# Altium PCB PCB3+.PcbDoc
Units mm, origin at the board's own origin, x right, y up, seen from the top; angles counter-clockwise.
Board outline 63.37 x 32.64 mm, 2 copper layers (Top Layer, Bottom Layer); 56 components, 26 nets, 163 pads, 8 vias.
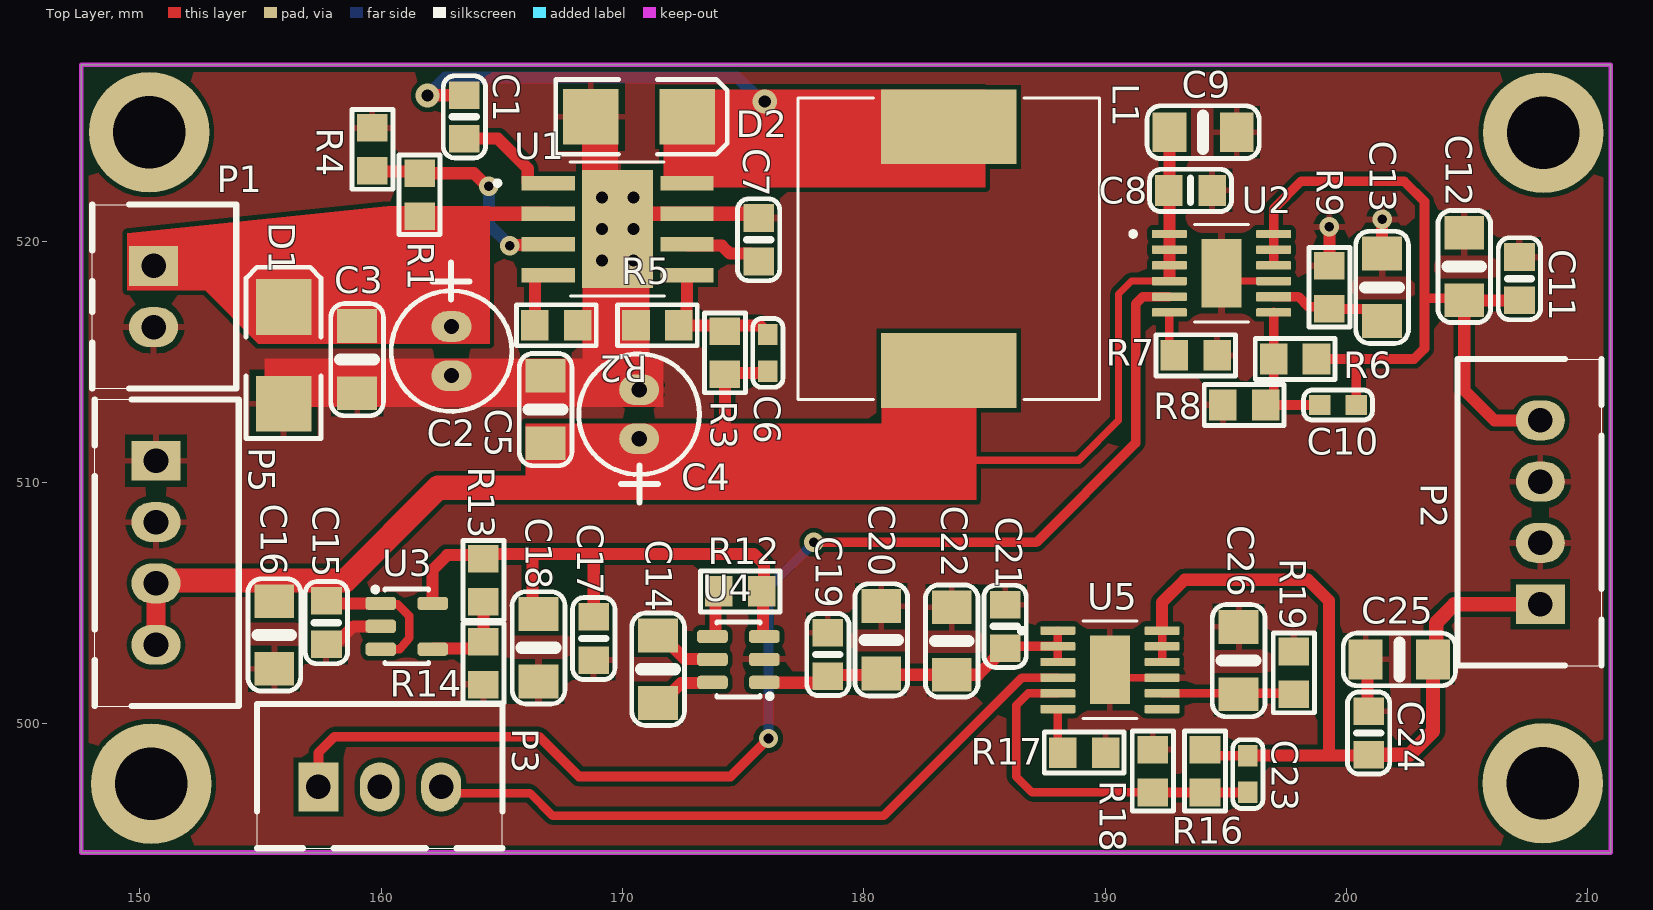
[diagram p0: Top Layer view]
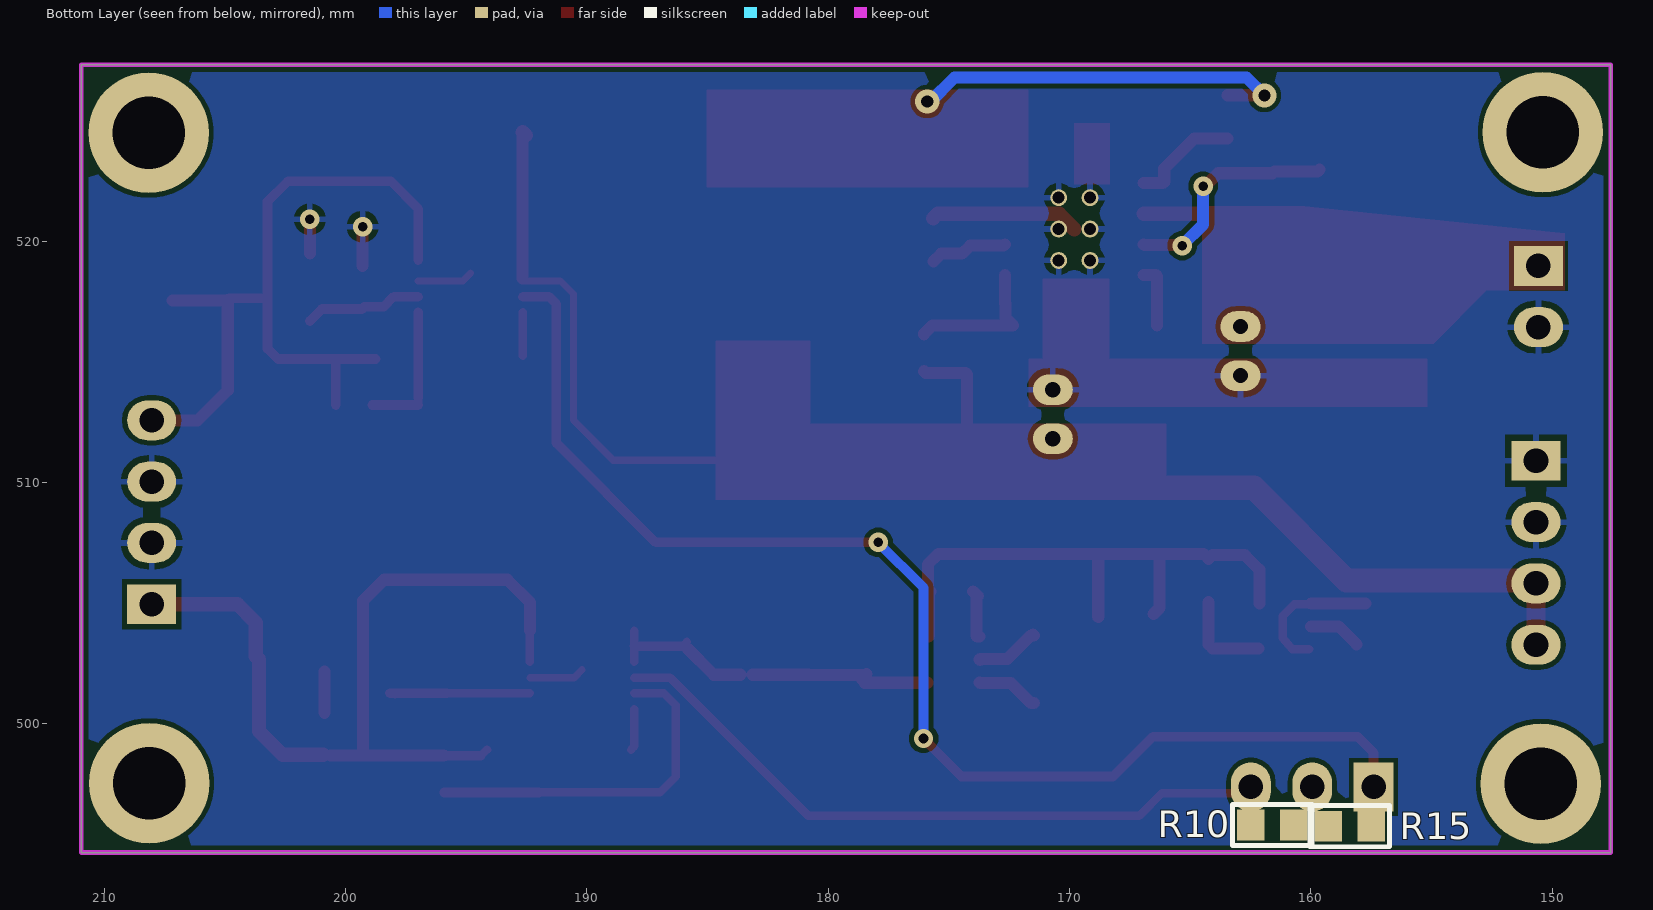
[diagram p1: Bottom Layer view, seen from below]
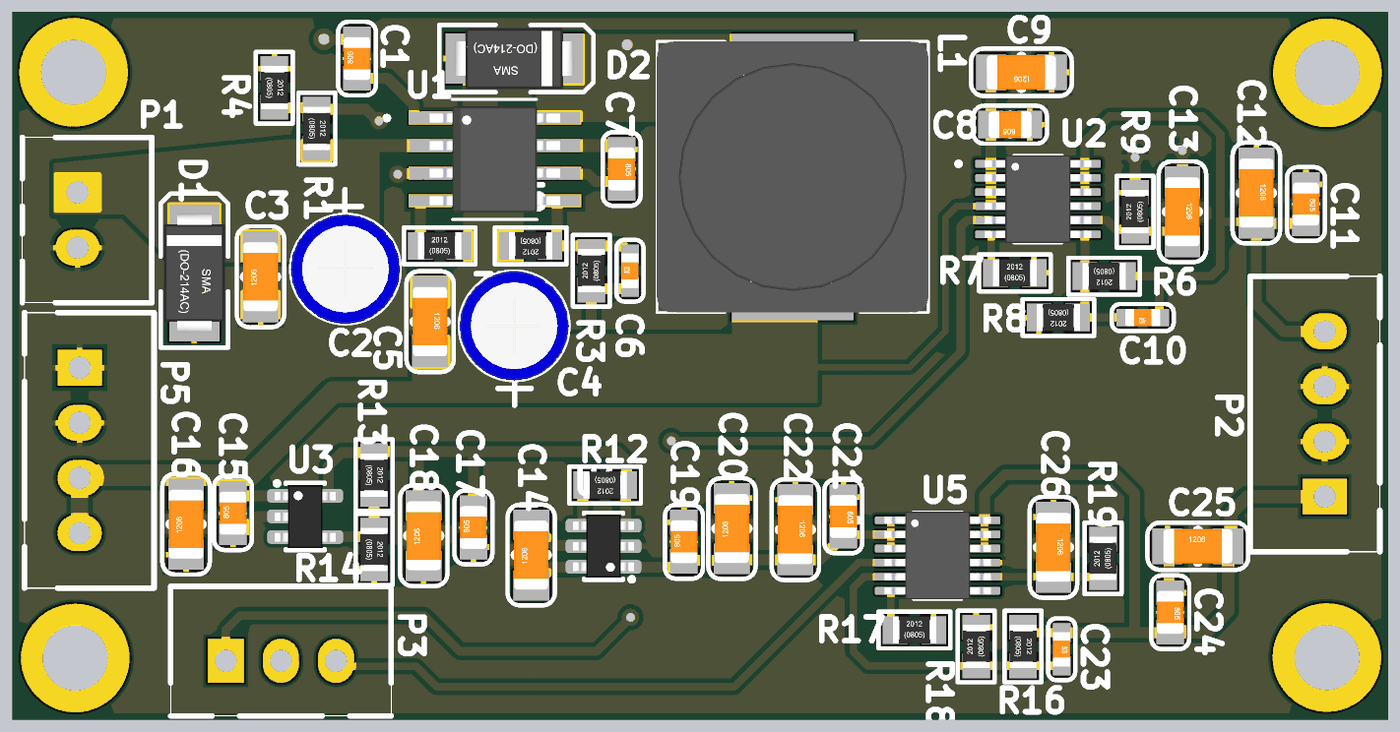
[diagram p2: 3D render of the assembled board from above, using the file's embedded part models]

## Layer stack, top to bottom
Top Solder: solder mask 0.0102, Solder Resist, Dk 3.5
Top Layer: signal copper 0.0356
Dielectric 1: dielectric 0.32, FR-4, Dk 4.8
Bottom Layer: signal copper 0.0356
Bottom Solder: solder mask 0.0102, Solder Resist, Dk 3.5

## Board outline
147.574,494.665 147.574,527.304 210.947,527.304 210.947,494.665

## Design rules (kind name [scope] priority, off if disabled: settings)
Clearance [All] p1: gap=0.2 ignorepadtopadclearanceinfootprint=FALSE except(0: Arc-Hole Track-Hole SMDPad-Hole THPad-Hole Via-Hole Fill-Hole Poly-Hole Region-Hole Text-Hole)
HoleSize [All] p1: absolutevalues=TRUE maxlimit=3 minlimit=0.025 maxpercent=80.000 minpercent=20.000
PolygonConnect [All] p1: connectstyle=Relief reliefconductorwidth=0.254 reliefentries=4 polygonreliefangle="90 Angle" airgapwidth=0.254
RoomDefinition Power2-5V [InComponentClass('Power2-5V')] p1: confinementstyle=ConfineIn formatcopy=TRUE lockcomponents=FALSE outline 0,0 50.8,0 50.8,25.4 0,25.4
RoutingVias [All] p1: holewidth=0.5 width=1 viastyle="Through Hole" minholewidth=0.4 minwidth=0.8 maxholewidth=1 maxwidth=2
SilkToSilkClearance [All] p1: silktosilkclearance=0
SilkToSolderMaskClearance [IsPad] p1: minsilkscreentomaskgap=0 clearancetoexposedcopper=TRUE
SolderMaskExpansion [All] p1: expansion=0.102 istentingtop=FALSE
SupplyNets "Schematic Supply Nets_7" [InNet('12V')] p1: voltage=0.000
SupplyNets "Schematic Supply Nets_6" [InNet('-5V')] p2: voltage=0.000
SupplyNets "Schematic Supply Nets_5" [InNet('-5.4V')] p3: voltage=0.000
SupplyNets "Schematic Supply Nets_4" [InNet('3V3')] p4: voltage=0.000
SupplyNets "Schematic Supply Nets_3" [InNet('+5.4V')] p5: voltage=0.000
SupplyNets "Schematic Supply Nets_2" [InNet('VBAT')] p6: voltage=0.000
SupplyNets "Schematic Supply Nets_1" [InNet('+5V')] p7: voltage=0.000
SupplyNets "Schematic Supply Nets" [InNet('GND')] p8: voltage=0.000
Width [All] p1: maxlimit=2 minlimit=0.254 preferedwidth=0.5 minimp=50.000000 maximp=50.000000 favimp=50.000000
27 further rules are at their usual default settings.

## Components (designator, comment, footprint, x,y, rotation, side; value= is the part's Value field where it differs from the comment)
C1 "100nF" "0805 Capacitor" 163.449,525.145 r90 top
C2 "47uf/50v/Low ESR" $CAP-RB-80MIL-D5MM 162.916,515.442 r270 top
C3 "10uF" "1206 Capacitor" 159.004,515.087 r90 top
C4 "47uf/25v/Low ESR" $CAP-RB-80MIL-D5MM 170.688,512.826 r90 top
C5 "22uF" "1206 Capacitor" 166.814,513.016 r270 top
C6 "22pF" "0603 Capacitor" 176.022,515.366 r90 top
C7 "100nF" "0805 Capacitor" 175.641,520.054 r270 top
C8 "100nF" "0805 Capacitor" 193.537,522.097 r180 top
C9 "10uF" "1206 Capacitor" 194.056,524.51 r180 top
C10 "10pF" "0603 Capacitor" 199.644,513.207 r180 top
C11 "100nF" "0805 Capacitor" 207.162,518.439 r270 top
C12 "22uF" "1206 Capacitor" 204.876,518.947 r270 top
C13 "10uF" "1206 Capacitor" 201.473,518.084 r270 top
C14 "1uF" "1206 Capacitor" 171.475,502.26 r90 top
C15 "100nF" "0805 Capacitor" 157.734,504.19 r90 top
C16 "1uF" "1206 Capacitor" 155.575,503.682 r90 top
C17 "100nF" "0805 Capacitor" 168.808,503.53 r90 top
C18 "2.2uF" "1206 Capacitor" 166.522,503.149 r90 top
C19 "100nF" "0805 Capacitor" 178.511,502.869 r90 top
C20 "2.2uF" "1206 Capacitor" 180.721,503.479 r90 top
C21 "100nF" "0805 Capacitor" 185.852,504.038 r270 top
C22 "10uF" "1206 Capacitor" 183.642,503.428 r270 top
C23 "10pF" "0603 Capacitor" 195.91,497.916 r270 top
C24 "100nF" "0805 Capacitor" 200.914,499.618 r270 top
C25 "22uF" "1206 Capacitor" 202.184,502.666 r0 top
C26 "10uF" "1206 Capacitor" 195.529,502.615 r270 top
D1 "SMBJ30CA" DO-214AC(SMA) 155.956,515.264 r0 top
D2 "SK54" DO-214AC(SMA) 170.688,525.145 r270 top
L1 "15uH/4A" IND_B82477R4103M100 183.515,519.684 r270 top
P1 "J2" "$xh-2pin male-L" 150.571,518.973 r270 top
P2 "J4" "$xh-4pin male-L" 208.026,504.952 r90 top
P3 "J3" "$xh-3pin male-L" 157.404,497.383 r0 top
P5 "J4" "$xh-4pin male-L" 150.673,510.896 r270 top
R1 "30.1K" "0805 Resistor" 161.595,521.919 r270 top
R2 "49.9K" "0805 Resistor" 167.259,516.509 r0 top
R3 "180K" "0805 Resistor" 174.244,515.366 r90 top
R4 "100K" "0805 Resistor" 159.639,523.799 r270 top
R5 "12.1K" "0805 Resistor" 171.45,516.509 r180 top
R6 "453K" "0805 Resistor" 197.866,515.112 r180 top
R7 "249K" "0805 Resistor" 193.751,515.264 r0 top
R8 "49.9K" "0805 Resistor" 195.758,513.207 r180 top
R9 "49.9K or 30.1K" "0805 Resistor" 199.288,518.084 r90 top
R10 "200K" "0805 Resistor" 161.595,495.808 r180 bottom
R12 "4.7K" "0805 Resistor" 174.879,505.485 r180 top
R13 "3K" "0805 Resistor" 164.236,505.943 r270 top
R14 "10K" "0805 Resistor" 164.236,502.514 r270 top
R15 "200K" "0805 Resistor" 158.394,495.757 r180 bottom
R16 "453K" "0805 Resistor" 194.132,498.043 r270 top
R17 "7.5K" "0805 Resistor" 189.128,498.805 r0 top
R18 "49.9K" "0805 Resistor" 191.973,498.043 r90 top
R19 "49.9K or 33.2K" "0805 Resistor" 197.815,502.107 r90 top
U1 "LMR16030PDDA" VREG_LMR16030PDDA 169.799,520.497 r0 top
U2 "LT3045EMSE#PBF" SOP65P490X110-13N#1 194.818,518.668 r0 top
U3 "AP2204" SOT23-5 161.061,504.038 r270 top
U4 "LM2776" SOT23-6 174.803,502.666 r180 top
U5 "LT3094EMSE#PBF" SOP65P490X110-13N#2 190.195,502.234 r0 top

## Footprints (in the part's own frame and the unit in brackets; to place one, negate y for a bottom-side part, rotate by r counter-clockwise, add the part's x,y. Pads: shape width x height; smd on the part's side, far side on the other; paste and mask are expansions set on the pad)
"0603 Capacitor" [mil]
  rect 35x32 smd: 1(-29.99,0.01) 2(30.01,0.01)
  silkscreen extent -56,-25 56,25, body extent -31,-16 32,16, height 12
"0805 Capacitor" [mm]
  rect 1.143x1.27 smd: 1(-0.9,0) 2(0.9,0)
  silkscreen extent -1.7,-0.87 1.7,0.87, body extent -1,-0.62 1,0.63, height 0.78
"0805 Resistor" [mil]
  rect 45x50 smd: 1(-35,0) 2(35,0)
  silkscreen extent -65,-33 65,33, body extent -39,-25 39,25, height 18
"1206 Capacitor" [mil]
  rect 55x65 smd: 1(-55,0) 2(55,0)
  silkscreen extent -92,-43 92,43, body extent -63,-31 63,31, height 39
$CAP-RB-80MIL-D5MM [mil]
  oval 50x65 hole 25: 1(-40,0) 2(40,0)
  silkscreen extent -144,-98 98,98, body extent -99,-99 99,99, height 446
"$xh-2pin male-L" [mil]
  rect 65x80 hole 40: 1(0,0)
  oval 65x80 hole 40: 2(100,0)
  silkscreen extent -100,-100 200,135, body extent -100,-100 200,135, height 295
"$xh-3pin male-L" [mil]
  rect 65x80 hole 40: 1(0,0)
  oval 65x80 hole 40: 2(100,0) 3(200,0)
  silkscreen extent -100,-100 300,135, body extent -100,-100 300,135, height 295
"$xh-4pin male-L" [mil]
  rect 65x80 hole 40: 1(0,0)
  oval 65x80 hole 40: 2(100,0) 3(200,0) 4(300,0)
  silkscreen extent -100,-100 400,135, body extent -100,-100 400,135, height 295
DO-214AC(SMA) [mm]
  rect 2.3x2.3 smd: 1(0,-2.003) 2(0,2.003)
  silkscreen extent -1.55,-3.45 1.55,3.65, body extent -1.4,-2.75 1.4,2.75, height 2.6
IND_B82477R4103M100 [mm]
  rect 3.1x5.6 smd: 1(-5.05,0) 2(5.05,0)
  silkscreen extent -6.25,-6.25 6.25,6.25, body extent -6.25,-6.25 6.25,6.25, height 8.5
SOP65P490X110-13N#1 [mm]
  rrect25% 1.45x0.35 smd paste+0 mask+0.102: 1(-2.16,1.625) 2(-2.16,0.975) 3(-2.16,0.325) 4(-2.16,-0.325) 5(-2.16,-0.975) 6(-2.16,-1.625) 7(2.16,-1.625) 9(2.16,-0.325) 10(2.16,0.325) 11(2.16,0.975) 12(2.16,1.625)
  rrect25% 1.45x0.4 smd paste+0 mask+0.102: 8(2.16,-0.975)
  rect 1.651x2.845 smd paste-2 mask+0.102: 13(0,0)
  silkscreen extent -3.76,-2.02 1.11,2.02, body extent -2.45,-2.02 2.45,2.02, height 1.1
SOP65P490X110-13N#2 [mm]
  rrect25% 1.45x0.35 smd paste+0 mask+0.102: 1(-2.16,1.625) 2(-2.16,0.975) 3(-2.16,0.325) 4(-2.16,-0.325) 5(-2.16,-0.975) 6(-2.16,-1.625) 7(2.16,-1.625) 8(2.16,-0.975) 9(2.16,-0.325) 10(2.16,0.325) 11(2.16,0.975) 12(2.16,1.625)
  rect 1.651x2.845 smd paste-2 mask+0.102: 13(0,0)
  silkscreen extent -3.76,-2.02 1.11,2.02, body extent -2.45,-2.02 2.45,2.02, height 1.1
SOT23-5 [mm]
  rrect50% 0.55x1.27 smd paste+0.038 mask+0.038: 1(-0.95,-1.075) 2(0,-1.075) 3(0.95,-1.075) 4(0.95,1.075) 5(-0.95,1.075)
  silkscreen extent -1.57,-1.35 1.55,0.9, body extent -1.44,-1.4 1.46,1.4, height 1.45
SOT23-6 [mm]
  rrect50% 1.27x0.55 smd paste+0.038 mask+0.038: 1(-1.075,0.95) 2(-1.075,0) 3(-1.075,-0.95) 4(1.075,-0.95) 5(1.075,0) 6(1.075,0.95)
  silkscreen extent -1.35,-1.55 0.9,1.57, body extent -1.4,-1.45 1.4,1.45, height 1.45
VREG_LMR16030PDDA [mm]
  rect 2.2x0.6 smd paste-0.025 mask+0.07: 1(-2.875,1.905) 2(-2.875,0.635) 3(-2.875,-0.635) 4(-2.875,-1.905) 5(2.875,-1.905) 6(2.875,-0.635) 7(2.875,0.635) 8(2.875,1.905)
  rect 2.95x4.9 smd paste-3 mask+0: 9(0,0)
  round 0.7 hole 0.5: 10(-0.65,1.3) 11(0.65,1.3) 12(-0.65,0) 13(0.65,0) 14(-0.65,-1.3) 15(0.65,-1.3)
  silkscreen extent -5.07,-2.77 1.95,2.77, body extent -3,-2.45 3,2.45, height 1.7

## Part data
C1 C3 C5 C6 C7 C8 C9 C10 C11 C12 C13 C14 C15 C16 C17 C18 C19 C20 C21 C22 C23 C24 C25 C26: library part "Capacitor SMD"
C2 C4: library part "Cap pol$", Device Code=124112
D1: library part SMBJ18A-13-F
D2: library part 1N4001
L1: library part B82477R4103M100, "Inductor de Potencia SMD 10 ÂµH 6.2 A Â±20 % 12.5x12.5x8.5 Injection molded base shielded EPCOS / TDK", Package="NON STANDARD-2 EPCOS", Check_prices=https://www.snapeda.com/parts/B82477R4103M100/EPCOS/view-part/?ref=eda, MF=EPCOS, MP=B82477R4103M100, SnapEDA_Link=https://www.snapeda.com/parts/B82477R4103M100/EPCOS/view-part/?ref=snap
P1: library part Connector2$, "Connector, 2Pin", Device Code=1111111
P2 P5: library part Connector4$, "Connector, 4Pin", Device Code=1111111
P3: library part Connector3$, "Connector, 3Pin", Device Code=1111111
R1 R2 R3 R4 R5 R6 R7 R8 R9 R10 R12 R13 R14 R15 R16 R17 R18 R19: library part "Resistor SMD"
U1: "SIMPLE SWITCHER 60V, 3A Step-Down Converter with 40uA Iq", Package="HSOIC-8 Texas Instruments", Check_prices=https://www.snapeda.com/parts/LMR16030PDDA/Texas+Instruments/view-part/?ref=eda, MF="Texas Instruments", MP=LMR16030PDDA, SnapEDA_Link=https://www.snapeda.com/parts/LMR16030PDDA/Texas+Instruments/view-part/?ref=snap
U2: "20V, 500mA, Ultralow Noise, Ultrahigh PSRR Linear Regulator", Package="MSOP -12 Analog Devices", Check_prices=https://www.snapeda.com/parts/LT3045EMSE%23PBF/Analog+Devices/view-part/?ref=eda, MF="Analog Devices", MP=LT3045EMSE#PBF, SnapEDA_Link=https://www.snapeda.com/parts/LT3045EMSE%23PBF/Analog+Devices/view-part/?ref=snap
U3: library part AP2112
U4: library part Tps563200
U5: library part LT3045EMSE#PBF, "20V, 500mA, Ultralow Noise, Ultrahigh PSRR Linear Regulator", Package="MSOP -12 Analog Devices", Check_prices=https://www.snapeda.com/parts/LT3045EMSE%23PBF/Analog+Devices/view-part/?ref=eda, MF="Analog Devices", MP=LT3045EMSE#PBF, SnapEDA_Link=https://www.snapeda.com/parts/LT3045EMSE%23PBF/Analog+Devices/view-part/?ref=snap

## Free pads (board coordinates)
  round 5 hole 3: 0(150.393,524.51) 0(150.47,497.51) 0(208.128,497.535) 0(208.153,524.485)

## Via types
v1: diameter 0.8, hole 0.4, Top Layer to Bottom Layer, tented both sides, 6 vias
v2: diameter 1, hole 0.5, Top Layer to Bottom Layer, tented both sides, 2 vias

## Nets (pads, with @x,y where several pads share a name; then routed paths per layer and width w, separated by ;. In a path a pad name is that pad's centre, name@x,y a point inside that pad or via, vN(x,y) a via of type N, cw(c..) or ccw(c..) an arc to the next point about the centre after c; other vN are vias at no path point)
3V3: P3.2 R10.2 R15.1
12V: C4.1 C5.2 C6.1 C8.2 C9.2 C15.2 C16.2 L1.2 P5.3 P5.4 R3.1 U2.1 U2.2 U2.3 U2.4 U3.1 U3.3 | length 53.1
  Top Layer w0.3: 183.058,509.854 184.125,510.921 188.9,510.921 190.551,512.572 190.551,517.804 191.089,518.343 U2.4
  Top Layer w0.35: U3.1@160.022,504.952 160.68,504.952 161.163,504.469 161.163,503.555 160.771,503.086 U3.3@160.061,503.086
  Top Layer w0.5: C15.2@157.734,504.988 U3.1 ; 174.168,511.81 174.244,511.886 R3.1 174.308,514.541 175.958,514.541 C6.1 ; U2.4@192.659,518.443 U2.3 U2.2 U2.1 192.659,522.097 C9.2
  Top Layer w0.6: C9.2@192.534,524.385 C9.2
  Top Layer w0.8: P5.4 P5.3
  Top Layer w1: P5.3 150.797,505.94 158.519,505.94 162.357,509.778 166.675,509.778 166.802,509.905
+5.4V: C17.2 C18.2 R12.1 R13.1 U3.5 U4.3 | length 24.2
  Top Layer w0.5: U3.5 162.136,506.383 162.738,506.984 164.084,506.984 R13.1 164.44,507.035 166.268,507.035 ; C18.2 166.268,504.799 166.268,507.035 ; C17.2 168.808,506.933 168.91,507.035 ; R12.1@175.823,505.549 R12.1@175.823,505.54 ; U4.3 175.848,503.616 175.823,503.641 R12.1@175.823,505.422 ; 166.268,507.035 168.91,507.035 ; 168.91,507.035 175.438,507.035 175.87,506.603 175.87,505.587 R12.1@175.823,505.54 ; R12.1@175.823,505.422 R12.1@175.823,505.54 ; R12.1@175.823,505.422 175.764,505.481 R12.1 R12.1@175.823,505.54
+5V: C10.1 C11.2 C12.2 P2.4 R6.1 U2.10 U2.11 U2.12 | length 33.2
  Top Layer w0.4: 196.978,519.201 U2.11 U2.12 196.978,521.336 198.12,522.478 202.387,522.478 203.225,521.64 203.225,517.627 ; R6.1 200.457,515.112 ; C10.1 200.406,515.061 200.457,515.112 ; C12.2 204.8,517.627 203.225,517.627 ; 200.457,515.112 202.794,515.112 203.225,515.544 203.225,517.627
  Top Layer w0.5: C11.2 204.888,517.539 C12.2 204.876,513.817 206.121,512.572 P2.4
-5.4V: C19.1 C20.1 C21.2 C22.2 U4.1 U5.1 U5.2 U5.3 | length 13.8
  Top Layer w0.35: U4.1 U4.1@175.893,501.701 ; C19.1@178.455,502.025 C19.1@178.537,501.944 ; C19.1@178.575,501.775 C19.1@178.651,501.775 ; C21.2@185.852,503.392 C21.2@186.034,503.209 ; U5.3 U5.2 U5.1
  Top Layer w0.4: C21.2@186.034,503.209 U5.2
  Top Layer w0.5: U4.1@175.893,501.701 C19.1@178.41,501.701 ; C19.1@178.41,502.071 178.455,502.025 C20.1@180.665,502.025 ; C19.1@178.499,501.701 178.499,501.957 C19.1 ; C20.1@180.797,502.031 C22.2@183.134,502.031 ; C22.2 184.745,502.031 C21.2
-5V: C23.1 C24.2 C25.2 P2.1 R16.1 U5.10 U5.11 U5.12 | length 35.4
  Top Layer w0.35: U5.10 U5.11 U5.12 ; R16.1 R16.1@194.386,498.678
  Top Layer w0.4: R16.1@194.386,498.678 C23.1
  Top Layer w0.5: U5.12 192.355,505.029 193.294,505.968 198.399,505.968 199.263,505.104 199.263,498.678 ; C23.1 199.263,498.678 ; C24.2@200.609,498.678 199.263,498.678
  Top Layer w0.6: C24.2 202.605,498.718 203.581,499.694 C25.2 203.708,502.793 203.708,504.19 204.47,504.952 P2.1
GND: C2.2 C3.1 C4.2 C5.1 C7.1 C8.1 C9.1 C11.1 C12.1 C13.1 C15.1 C16.1 C17.1 C18.1 C19.2 C20.2 C21.1 C22.1 C24.1 C25.1 C26.1 D1.1 D2.1 P1.2 P2.2 P2.3 P5.1 P5.2 R2.2 R4.1 R5.2 R7.2 R8.2 R9.2 R14.2 R17.2 R18.2 R19.2 U1.7 U1.9 U1.10 U1.11 U1.12 U1.13 U1.14 U1.15 U2.9 U2.13 U3.2 U4.2 U5.9 U5.13 | length 17.7
  Top Layer w0.3: U5.13 190.52,501.909 U5.9 ; U2.13 195.143,518.343 U2.9
  Top Layer w0.5: C15.1@158.104,503.29 158.852,504.038 U3.2 ; R9.2 v1(199.288,520.598) ; C24.1@200.863,500.456 C25.1@200.863,502.158 ; C13.1 v1(201.473,520.903)
  Top Layer w0.6: U1.9 170.434,521.132 U1.7 175.463,521.132 C7.1
NetC1_1: C1.1 U1.1 | length 4.6
  Top Layer w0.5: C1.1 164.834,524.245 166.074,523.005 166.074,522.452 166.124,522.402 U1.1
NetC1_2: C1.2 D2.2 L1.1 U1.8 | length 16.2
  Top Layer w0.5: v2(161.925,526.034) 161.93,526.039 163.443,526.039 C1.2
  Bottom Layer w0.5: v2(161.925,526.034) 162.662,526.771 174.769,526.771 175.76,525.78 v2(175.895,525.78)
NetC6_2: C6.2 R3.2 R5.1 U1.5 | length 6.1
  Top Layer w0.5: U1.5 172.674,517.416 172.66,517.402 172.66,516.831 R5.1 175.679,516.509 176.022,516.166 C6.2
NetC7_2: C7.2 U1.6 | length 3.3
  Top Layer w0.5: U1.6 172.724,519.812 174.116,519.812 174.453,519.475 175.319,519.475 C7.2
NetC10_2: C10.2 R6.2 R8.1 U2.7 | length 5.7
  Top Layer w0.35: R8.1@196.977,513.207 196.977,513.511 R8.1@196.978,513.512
  Top Layer w0.4: R8.1@196.977,513.207 C10.2 ; R8.1@196.978,513.512 U2.7
NetC13_2: C13.2 R9.1 U2.8 | length 4.9
  Top Layer w0.4: U2.8 198.003,517.693 198.425,517.271 199.212,517.271 R9.1 199.298,517.185 200.974,517.185 C13.2
NetC14_1: C14.1 U4.6 | length 2.6
  Top Layer w0.5: C14.1 171.602,500.863 172.431,501.691 173.703,501.691 U4.6
NetC14_2: C14.2 U4.5 | length 2.7
  Top Layer w0.5: C14.2@171.511,503.693 C14.2 171.602,503.657 172.568,502.691 173.703,502.691 U4.5 U4.5@173.703,502.641
NetC23_2: C23.2 R16.2 R18.1 U5.5 | length 14.8
  Top Layer w0.35: U5.5 186.807,501.259 186.309,500.761 186.309,497.815 186.969,497.154 R18.1
  Top Layer w0.4: R18.1 R16.2 C23.2
NetC26_2: C26.2 R19.1 U5.8 | length 5.9
  Top Layer w0.35: U5.8 C26.2@195.783,501.259 ; R19.1@197.901,501.259 R19.1@197.942,501.218
  Top Layer w0.4: C26.2@195.783,501.259 R19.1@198.155,501.259
NetR1_1: R1.1 R4.2 U1.3 | length 9.5
  Top Layer w0.5: R4.2@159.639,522.961 159.715,522.884 161.519,522.884 R1.1 163.85,522.808 164.384,522.275 v1(164.465,522.275) ; v1(165.329,519.811) 165.354,519.836 166.899,519.836 U1.3
  Bottom Layer w0.5: v1(164.465,522.275) 164.465,520.689 165.329,519.825 v1(165.329,519.811)
NetR2_1: R2.1 U1.4 | length 2.6
  Top Layer w0.5: R2.1 166.37,518.542 166.42,518.592 U1.4
NetR7_1: R7.1 U2.6 | length 1.8
  Top Layer w0.35: U2.6 U2.6 R7.1@192.659,515.239
NetR12_2: R12.2 U4.4 | length 2.2
  Top Layer w0.5: U4.4 173.834,503.616 173.859,503.641 R12.2@173.859,505.363 ; R12.2@173.859,505.236 173.799,505.295 R12.2
NetR13_2: R13.2 R14.1 U3.4 | length 3.7
  Top Layer w0.5: U3.4@162.161,503.113 R14.1@164.073,503.113 ; R14.1@164.236,503.276 R13.2
NetR17_1: R17.1 U5.6 | length 1.7
  Top Layer w0.35: U5.6 188.035,499.06 R17.1@188.163,498.932
PG1: P3.1 R15.2 U2.5 | length 53.2
  Top Layer w0.4: P3.1@157.404,497.129 P3.1 157.404,498.805 158.064,499.466 166.548,499.466 168.199,497.815 174.473,497.815 v1(176.047,499.389) ; v1(177.927,507.517) 187.147,507.517 191.262,511.632 191.262,517.398 191.557,517.693 U2.5
  Bottom Layer w0.4: v1(176.047,499.389) 176.047,505.638 v1(177.927,507.517)
PG2: P3.3 R10.1 U5.4 | length 28.3
  Top Layer w0.35: P3.3@162.484,497.129 166.167,497.129 167.107,496.189 180.823,496.189 186.543,501.909 U5.4
VBAT: C2.1 C3.2 D1.2 P1.1 R1.2 U1.2 | length 5.4
  Top Layer w0.5: R1.2 R1.2@161.696,521.132
  Top Layer w0.6: R1.2@161.696,521.132 U1.2
pads on no net: U5.7

## Polygon pours and split planes (outlines as drawn)
GND on Bottom Layer "GND_L02_P000" (solid, remove dead copper, pour order 0): 147.574,494.665 147.574,527.304 210.947,527.304 210.947,494.665
GND on Top Layer "GND_L01_P001" (solid, remove dead copper, pour order 1): 147.574,494.665 147.574,527.304 210.947,527.304 210.947,494.665

## Keep-outs
Keep-Out Layer:
  the board outline again, w0.2

## Other copper
Top Layer:
  rectangle net GND: 155.169,513.131 171.704,515.137
  rectangle net GND: 168.351,513.461 171.12,518.439
  rectangle net GND: 168.326,522.351 169.824,524.891
  rectangle net 12V: 180.721,509.27 184.658,515.874
  rectangle net 12V: 165.989,509.27 182.88,512.445
  rectangle net NetC1_2: 171.704,522.224 185.039,526.288
  region net VBAT: 164.49,521.437 160.249,521.437 149.479,520.323 149.479,517.957 152.705,517.957 154.915,515.747 164.49,515.747 164.49,521.31